# Altium PCB Sound_Sensor.PcbDoc (part 2 of 3)
Units mil, origin at the board's own origin, x right, y up, seen from the top; angles counter-clockwise.
Board outline 3543.31 x 3543.31 mil, 2 copper layers (Top Layer, Bottom Layer), stack 57 mil thick; 199 components, 167 nets, 606 pads, 246 vias.
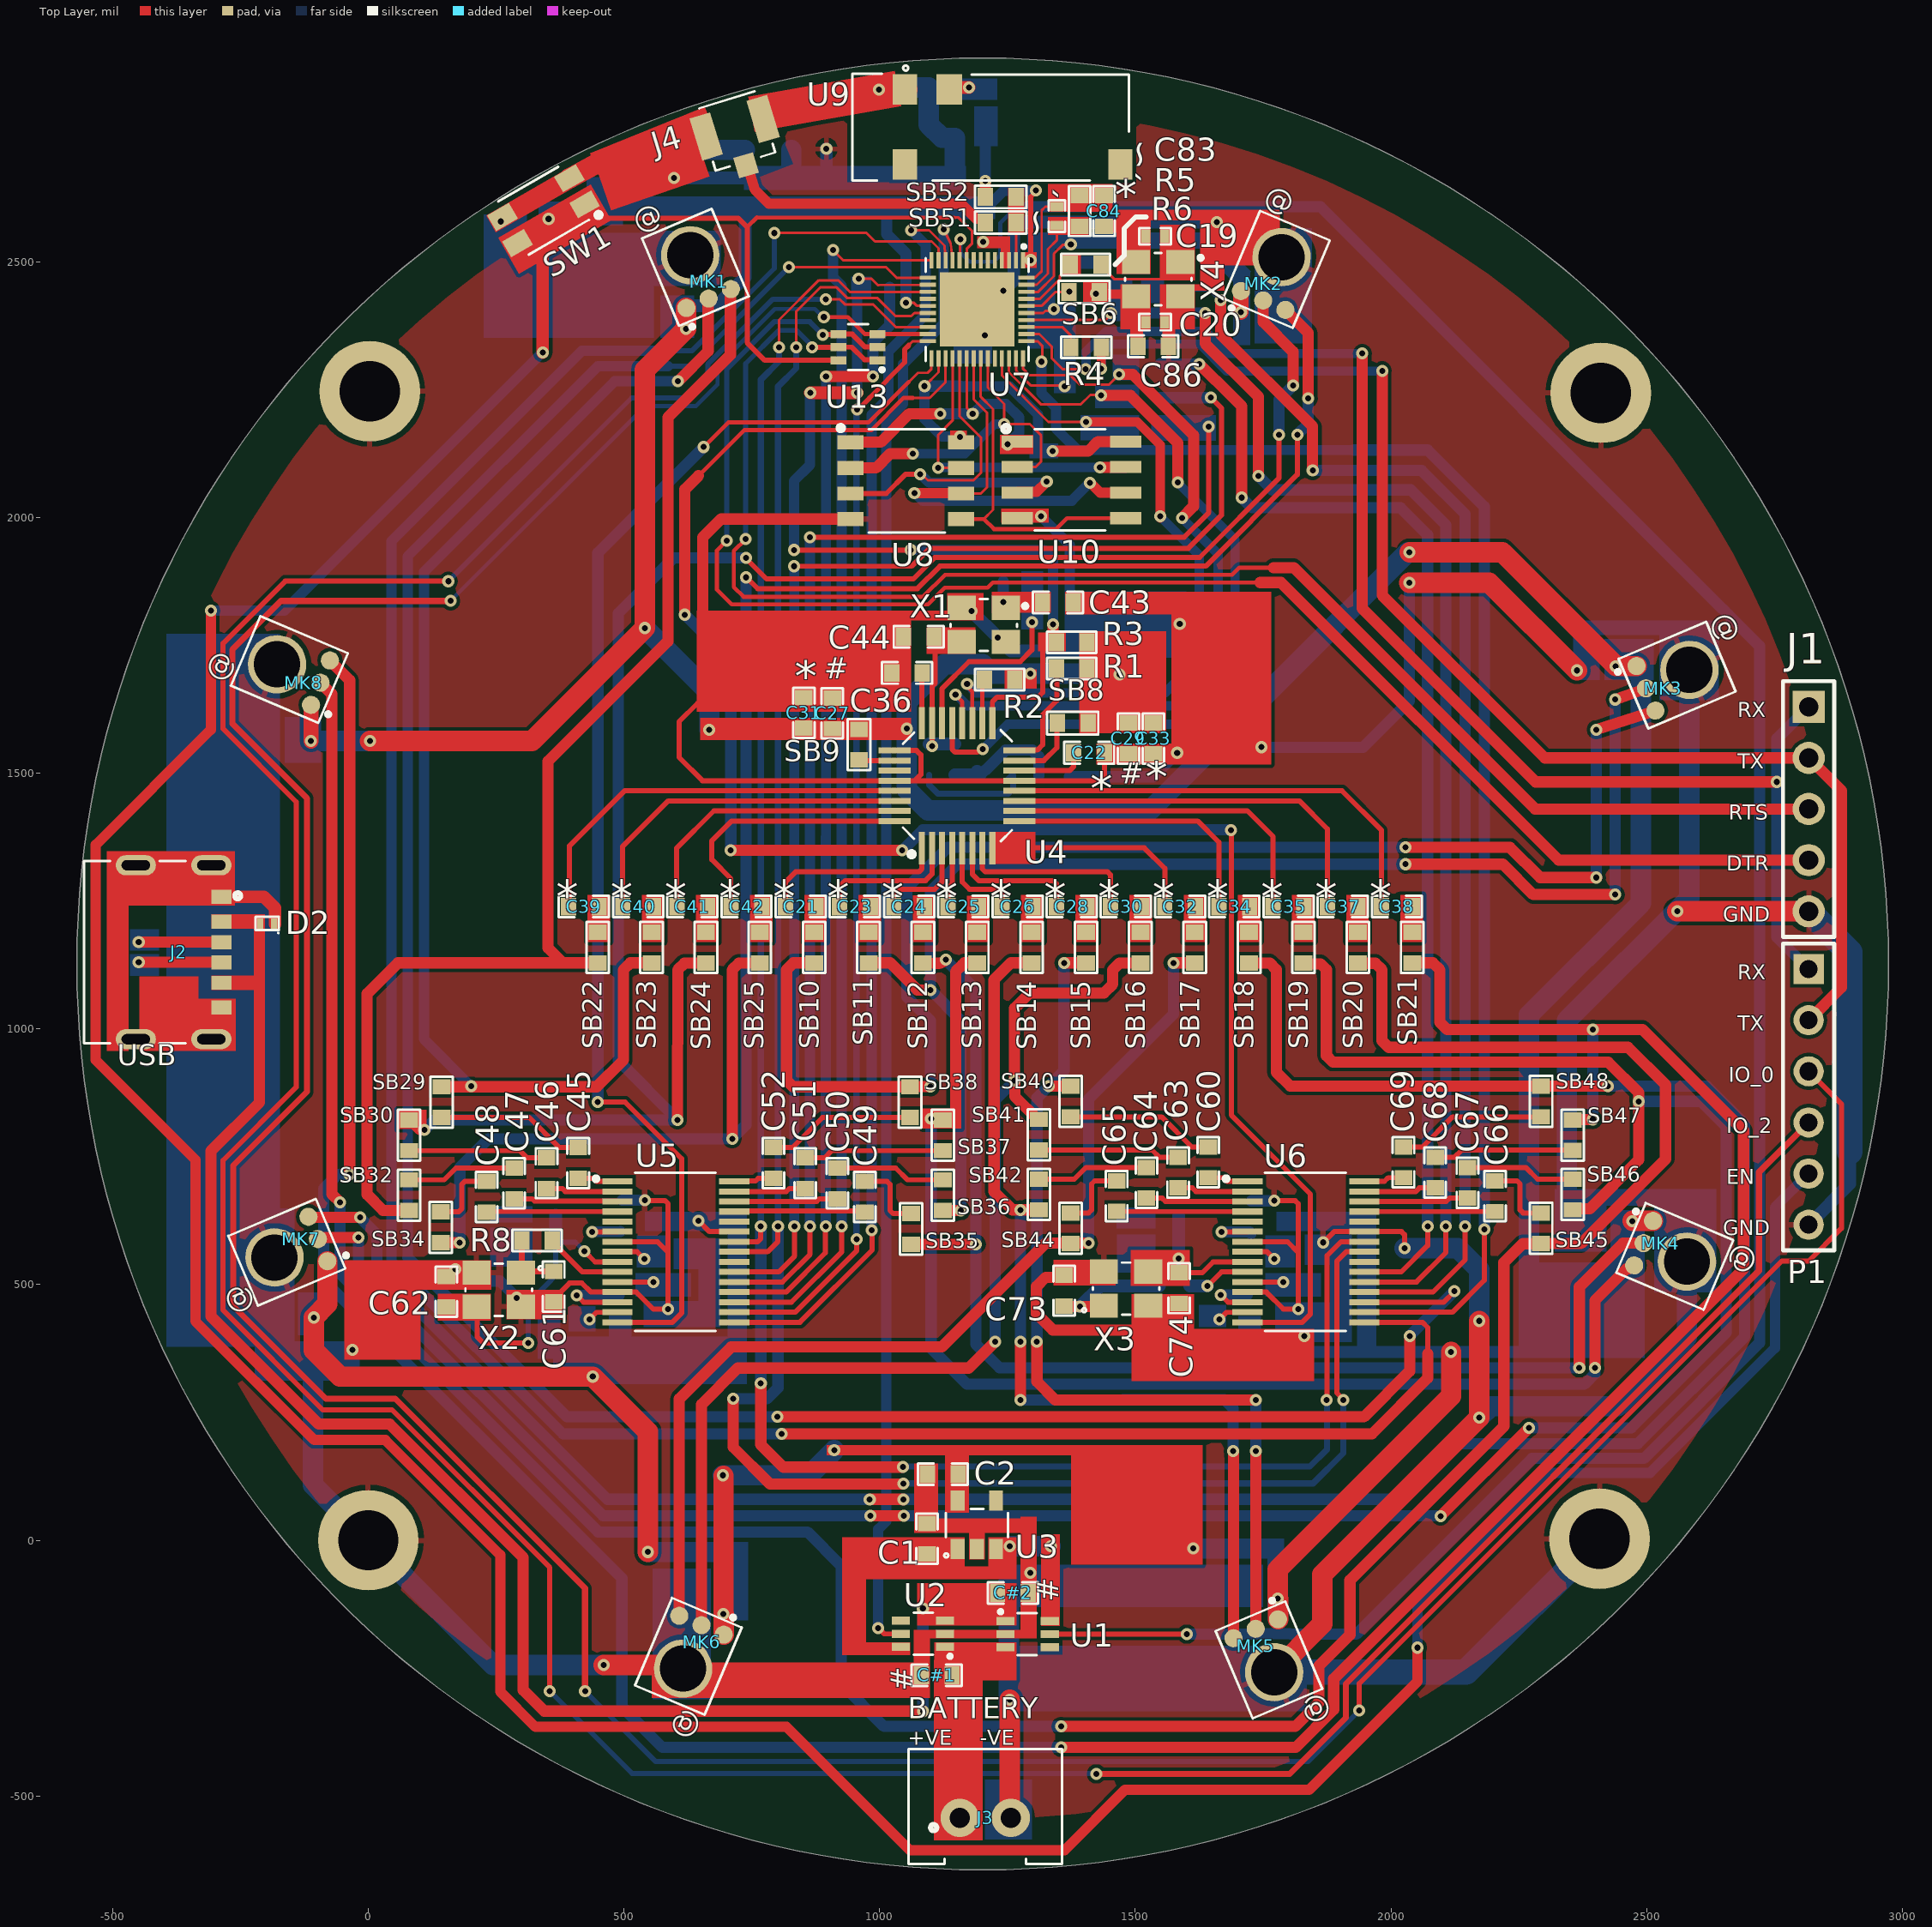
[diagram p0: Top Layer view]

## Part data (continued)
D2 D3: "DIODE TVS SMD 5.5V 5A 90W", Breakdown Voltage=6V, Capacitance=12pF, Case/Package=SON, Clamping Voltage=14V, Leakage Current=100nA, Manufacturer="Texas Instruments", Max Operating Temperature=125°C, Min Operating Temperature=-40°C, Package Quantity=1, Peak Pulse Current=5A, Peak Pulse Power=90W, Power Line Protection=No, Resistor Type=Zener, Reverse Standoff Voltage=5.5V, Supplier Part Number 1=595-TPD1E10B06DPYR, Test Current=1mA, Category="TVS Diodes", ComponentLink1Description=https://datasheet.ciiva.com/22691/1877100-22691786.pdf?src-supplier=Element14, ComponentLink1URL=https://datasheet.ciiva.com/22691/1877100-22691786.pdf?src-supplier=Element14, ComponentLink2Description=https://datasheet.ciiva.com/46384/1877100-46384054.pdf?src-supplier=Element14, ComponentLink2URL=https://datasheet.ciiva.com/46384/1877100-46384054.pdf?src-supplier=Element14, ComponentLink3Description=https://datasheet.ciiva.com/2961/tpd1e10b06-2961245.pdf?src-supplier=Digi-Key, ComponentLink3URL=https://datasheet.ciiva.com/2961/tpd1e10b06-2961245.pdf?src-supplier=Digi-Key, ComponentLink4Description=https://datasheet.ciiva.com/6574/tpd1e10b06-6574654.pdf?src-supplier=Digi-Key, ComponentLink4URL=https://datasheet.ciiva.com/6574/tpd1e10b06-6574654.pdf?src-supplier=Digi-Key, ComponentLink5Description=https://datasheet.ciiva.com/2961/tpd1e10b06-2961246.pdf?src-supplier=Digi-Key, ComponentLink5URL=https://datasheet.ciiva.com/2961/tpd1e10b06-2961246.pdf?src-supplier=Digi-Key, ComponentLink6Description=https://datasheet.ciiva.com/14195/tpd1e10b06-14195178.pdf?src-supplier=Avnet, ComponentLink6URL=https://datasheet.ciiva.com/14195/tpd1e10b06-14195178.pdf?src-supplier=Avnet, Contact Plating=Gold, Diode Type=ZENER, Direction=Bidirectional, Element Configuration=Single, ESD Protection=Yes, Height=0.35mm, Interface=GPIO, Lead Free="Lead Free", Length=1.1mm, Manufacturer Part Number=TPD1E10B06DPYR, Max Reverse Leakage Current=100nA, Min Breakdown Voltage=6V, Number of Bidirectional Channels=1, Number of Channels=1, Number of Pins=2, Packaging="Tape and Reel", Pricing 1="1=0.39000, 10=0.29800, 50=0.29800, 100=0.18600, 500=0.12700, 1000=0.09800, 2500=0.08300, 10000=0.07500 (USD)", Radiation Hardening=No, REACH SVHC="No SVHC", RoHS=Yes, RoHS Compliant=Yes, Series=-, Supplier 1=Mouser, Width=0.7mm, Working Voltage=5.5V
J1: "05P MTA100 HDR ASSY (NARROW)", Color=Natural, Contact Current Rating=5A, Contact Resistance=6mR, Flammability Rating="UL94 V-0", Manufacturer="TE Connectivity", Max Operating Temperature=221°C, Max Voltage Rating (AC)=250V, Min Operating Temperature=-67°C, Package Quantity=500, Supplier Part Number 1=A31115-ND, Approvals=CSA, Backwall/Post Interruptions="No (Without)", Category=Connectors, ComponentLink1Description=https://datasheet.ciiva.com/16307/3-644456-5-16307486.pdf?src-supplier=Future+Electronics, ComponentLink1URL=https://datasheet.ciiva.com/16307/3-644456-5-16307486.pdf?src-supplier=Future+Electronics, ComponentLink2Description=https://datasheet.ciiva.com/3118/eng-ds-82056-mta-0608-3118213.pdf?src-supplier=Avnet, ComponentLink2URL=https://datasheet.ciiva.com/3118/eng-ds-82056-mta-0608-3118213.pdf?src-supplier=Avnet, ComponentLink3Description=https://datasheet.ciiva.com/30250/8852eng-ds-82056-mta-0608-30250984.pdf?src-supplier=Onlinecomponents.com, ComponentLink3URL=https://datasheet.ciiva.com/30250/8852eng-ds-82056-mta-0608-30250984.pdf?src-supplier=Onlinecomponents.com, ComponentLink4Description=https://datasheet.ciiva.com/14641/70087179-14641766.pdf?src-supplier=Allied+Electronics, ComponentLink4URL=https://datasheet.ciiva.com/14641/70087179-14641766.pdf?src-supplier=Allied+Electronics, ComponentLink5Description=https://datasheet.ciiva.com/709/eng-cd-644456-d2-709724.pdf?src-supplier=Digi-Key, ComponentLink5URL=https://datasheet.ciiva.com/709/eng-cd-644456-d2-709724.pdf?src-supplier=Digi-Key, Connector System=Wire-to-Board, Connector Type=Plug,Header,Pin, Contact Finish - Mating=TIN, Contact Gender=Male, Contact Material="Copper Alloy", Contact Mating Length=7.49mm, Contact Plating=Tin,Matte, Contact Retention="No (Without)", Contact Shape=Square, Contact Style=Straight, Contact Type="Male Pin", Current Rating=5A, Depth=2.33mm, ELV=Compliant, Gender=Male, Height=10.03mm, Housing Color=Natural, Housing Material=Polyester, Insulation Color=Natural, Insulation Material=Thermoplastic, Lead Free="Lead Free", Length=12.4mm, Manufacturer Part Number=3-644456-5, Mating Alignment="No (Without)", Mating Retention="No (Without)", Mount="Through Hole", Number of Contacts=5, Number of Positions=5, Number of Rows=1, Orientation=Straight, Packaging=Bag, PCB Mount Alignment="No (Without)", PCB Mount Retention=Without, PCB Mounting Orientation=Vertical, PCB Thickness=0.063inch, Pitch=2.54mm, Plating Thickness=1.27um, Pricing 1="1=0.45000, 10=0.39200, 100=0.32330, 500=0.28114, 1000=0.23195, 5000=0.20383, 10000=0.18978 (USD)", Radiation Hardening=No, REACH SVHC=Unknown, RoHS=Yes, Sealable="No (Without)", Series=MTA-100, Shrouded="No (Without)", Stock 1=30835, Strain Relief="No (Without)", Supplier 1=Digi-Key, Tail Length=0.11inch, Termination=Solder, Underplate Material=Nickel, Voltage Rating=250V, Voltage Rating (AC)=250V
J2: "USB 3.1 1 Surface Mount 6 Female -25℃~+85℃ Type-C SMD USB Connectors ROHS", Manufacturer=XKB, ComponentLink1Description=LCSC, ComponentLink1URL=https://www.lcsc.com/product-detail/span-style-background-color-ff0-USB-span-Connectors_XKB-Connectivity-U262-061N-4BVC11_C2764612.html, Manufacturer Part Number=U262-061N-4BVC11
J3: library part "2 Pin JST Connector", "2 PIN JST Connector"
J4: "CONN U.FL RCPT STR 50 OHM SMD", Case/Package=SMD/SMT, Manufacturer=Hirose, Package Quantity=10000, Supplier Part Number 1=U.FL-R-SMT-1(80)-CUTT, ComponentLink1Description=https://www.hirose.com/product/en/download_file/key_name/U.FL-R-SMT-1%2880%29/category/Specification%20Sheet/doc_file_id/37638/?file_category_id=9&item_id=03310472280&is_series=&src-supplier=Digi-Key, ComponentLink1URL=https://www.hirose.com/product/en/download_file/key_name/U.FL-R-SMT-1%2880%29/category/Specification%20Sheet/doc_file_id/37638/?file_category_id=9&item_id=03310472280&is_series=&src-supplier=Digi-Key, ComponentLink2Description=http://www.mouser.com/ds/2/185/U.FL_catalog-939761.pdf?src-supplier=Mouser, ComponentLink2URL=http://www.mouser.com/ds/2/185/U.FL_catalog-939761.pdf?src-supplier=Mouser, Lead Free="Lead Free", Manufacturer Part Number=U.FL-R-SMT-1(80), Packaging="Tape and Reel", Pricing 1="1=1.07, 500=0.785, 1500=0.74, 2500=0.72, 5000=0.695 (USD)", Stock 1=1272, Supplier 1="Future Electronics"
L1: library part SDCL1608C2N0STDF, "2nH ±0.3nH 0603 Inductors", Manufacturer=Sunlord, Package Case=0603, Rated Current=300mA, Inductance=2nH
L2 L3: library part LQG18HN3N3S00D, "FIXED IND 3.3NH 1A 120 MOHM SMD", Case Code (Imperial)=0603, Case Code (Metric)=1608, Current Rating=500mA, DC Resistance (DCR)=150mR, Manufacturer=Murata, Max Operating Temperature=85°C, Min Operating Temperature=-55°C, Package Quantity=4000, Self Resonant Frequency=6GHz, Supplier Part Number 1=7254954, Test Frequency=100MHz, Case/Package=0603, Category="Fixed Inductors", ComponentLink1Description=https://datasheet.ciiva.com/11801/0900766b80f1087c-11801482.pdf?src-supplier=RSComponents, ComponentLink1URL=https://datasheet.ciiva.com/11801/0900766b80f1087c-11801482.pdf?src-supplier=RSComponents, ComponentLink2Description=https://datasheet.ciiva.com/8510/l0075s0083lqg18h-8510694.pdf?src-supplier=Avnet, ComponentLink2URL=https://datasheet.ciiva.com/8510/l0075s0083lqg18h-8510694.pdf?src-supplier=Avnet, ComponentLink3Description=https://datasheet.ciiva.com/8002/5102-8002599.pdf?src-supplier=Element14, ComponentLink3URL=https://datasheet.ciiva.com/8002/5102-8002599.pdf?src-supplier=Element14, ComponentLink4Description=https://datasheet.ciiva.com/6690/l0075s0083lqg18h-6690799.pdf?src-supplier=Digi-Key, ComponentLink4URL=https://datasheet.ciiva.com/6690/l0075s0083lqg18h-6690799.pdf?src-supplier=Digi-Key, ComponentLink5Description=https://datasheet.ciiva.com/4978/o05e-4978491.pdf?src-supplier=Mouser, ComponentLink5URL=https://datasheet.ciiva.com/4978/o05e-4978491.pdf?src-supplier=Mouser, ComponentLink6Description=https://datasheet.ciiva.com/18089/getdatasheetpartid-180322-18089964.pdf?src-supplier=Verical, ComponentLink6URL=https://datasheet.ciiva.com/18089/getdatasheetpartid-180322-18089964.pdf?src-supplier=Verical, ComponentLink7Description=https://datasheet.ciiva.com/6690/l0075s0083lqg18h-6690797.pdf?src-supplier=Digi-Key, ComponentLink7URL=https://datasheet.ciiva.com/6690/l0075s0083lqg18h-6690797.pdf?src-supplier=Digi-Key, ComponentLink8Description=https://datasheet.ciiva.com/6690/l0075s0083lqg18h-6690798.pdf?src-supplier=Digi-Key, ComponentLink8URL=https://datasheet.ciiva.com/6690/l0075s0083lqg18h-6690798.pdf?src-supplier=Digi-Key, Core Material=Air, DC Current=500mA, Depth=0.95mm, Height=0.8mm, Height - Seated (Max)=0.037inch, Inductance=3.3nH, Lead Free="Lead Free", Length=1.6mm, Manufacturer Part Number=LQG18HN3N3S00D, Max DC Current=500mA, Military Standard=Not, Mount="Surface Mount", Packaging="Tape and Reel", Pricing 1="10=0.18800, 500=0.08200, 1000=0.07100, 2000=0.05900, 5000=0.05600 (USD)", Q Factor=12, Radiation Hardening=No, Rated Current-Max=500mA, REACH SVHC="No SVHC", RoHS=Yes, RoHS Compliant=Yes, Series=LQG18H, Shielding=Unshielded, Stock 1=1, Supplier 1=RSComponents, Termination=SMD/SMT, Width=0.8mm
L4 L5: library part LQG15HS1N2S02D, "FIXED IND 1.2NH 1A 90 MOHM SMD", Case Code (Imperial)=0402, Case Code (Metric)=1005, Current Rating=300mA, DC Resistance (DCR)=90mR, Manufacturer=Murata, Max Operating Temperature=125°C, Min Operating Temperature=-55°C, Package Quantity=10000, Self Resonant Frequency=6GHz, Supplier Part Number 1=8119795, Test Frequency=100MHz, Case/Package=0402, Category="Fixed Inductors", ComponentLink1Description=https://datasheet.ciiva.com/11801/0900766b8090d53b-11801370.pdf?src-supplier=RSComponents, ComponentLink1URL=https://datasheet.ciiva.com/11801/0900766b8090d53b-11801370.pdf?src-supplier=RSComponents, ComponentLink2Description=https://datasheet.ciiva.com/16207/product-16207869.pdf?src-supplier=Future+Electronics, ComponentLink2URL=https://datasheet.ciiva.com/16207/product-16207869.pdf?src-supplier=Future+Electronics, ComponentLink3Description=https://datasheet.ciiva.com/1038/l0075s0083lqg15hs-1038116.pdf?src-supplier=Digi-Key, ComponentLink3URL=https://datasheet.ciiva.com/1038/l0075s0083lqg15hs-1038116.pdf?src-supplier=Digi-Key, ComponentLink4Description=https://datasheet.ciiva.com/1038/l0075s0083lqg15hs-1038115.pdf?src-supplier=Digi-Key, ComponentLink4URL=https://datasheet.ciiva.com/1038/l0075s0083lqg15hs-1038115.pdf?src-supplier=Digi-Key, ComponentLink5Description=https://datasheet.ciiva.com/1038/l0075s0083lqg15hs-1038117.pdf?src-supplier=Digi-Key, ComponentLink5URL=https://datasheet.ciiva.com/1038/l0075s0083lqg15hs-1038117.pdf?src-supplier=Digi-Key, ComponentLink6Description=https://datasheet.ciiva.com/4977/o05e-4977850.pdf?src-supplier=Mouser, ComponentLink6URL=https://datasheet.ciiva.com/4977/o05e-4977850.pdf?src-supplier=Mouser, ComponentLink7Description=https://datasheet.ciiva.com/8510/l0075s0083lqg15hs-8510828.pdf?src-supplier=Avnet, ComponentLink7URL=https://datasheet.ciiva.com/8510/l0075s0083lqg15hs-8510828.pdf?src-supplier=Avnet, Core Material=Air, DC Current=300mA, Depth=0.55mm, Height=0.5mm, Height - Seated (Max)=0.022inch, Inductance=1.2nH, Lead Free="Lead Free", Length=1mm, Manufacturer Part Number=LQG15HS1N2S02D, Max DC Current=300mA, Military Standard=Not, Mount="Surface Mount", Packaging="Tape and Reel", Pricing 1="100=0.04000, 5000=0.02800, 10000=0.02200, 20000=0.02000, 50000=0.01700 (USD)", Q Factor=8, Radiation Hardening=No, Rated Current-Max=300mA, RoHS=Yes, RoHS Compliant=Yes, Series=LQG15HS, Shielding=Unshielded, Stock 1=1, Supplier 1=RSComponents, Termination=SMD/SMT, Width=0.02inch
L6: library part FHW0603UC1N6KST, "IND 700mA 1.6nH ±10% 40mΩ 0603"
MK1 MK2 MK3 MK4 MK5 MK6 MK7 MK8: "MICROPHONE MEMS ANALOG NC -32DB", Manufacturer="TDK InvenSense", Operating Supply Current=285uA, Supplier Part Number 1=69AC5942, ComponentLink1Description=https://www.invensense.com/wp-content/uploads/2017/01/ICS-40730-Datasheet.pdf?src-supplier=Digi-Key, ComponentLink1URL=https://www.invensense.com/wp-content/uploads/2017/01/ICS-40730-Datasheet.pdf?src-supplier=Digi-Key, ComponentLink2Description=http://www.invensense.com/wp-content/uploads/2018/12/DS-000139-ICS-40730-v1.0.pdf?src-supplier=Digi-Key, ComponentLink2URL=http://www.invensense.com/wp-content/uploads/2018/12/DS-000139-ICS-40730-v1.0.pdf?src-supplier=Digi-Key, Impedance=750R, Manufacturer Part Number=ICS-40730, Output Type=Analog, Packaging="Cut Tape", Pricing 1="1=3.61000, 10=2.99000, 25=2.76000, 50=2.59000, 100=2.43000 (USD)", RoHS=No, RoHS Compliant=No, Shape=Rectangular, Stock 1=51, Supplier 1=Newark, Termination=Solder
P1: library part e-50004, "CONN HEADER VERT 6POS 2.54MM", Color=Black, Current Rating=3A, Manufacturer="Wurth Electronics", Max Operating Temperature=125°C, Min Operating Temperature=-40°C, Supplier Part Number 1=732-5319-ND, Voltage Rating=250V, ComponentLink1Description=http://www.farnell.com/cad/1737268.pdf?src-supplier=Element14, ComponentLink1URL=http://www.farnell.com/cad/1737268.pdf?src-supplier=Element14, ComponentLink2Description=https://katalog.we-online.de/em/datasheet/6130xx11121.pdf?src-supplier=Digi-Key, ComponentLink2URL=https://katalog.we-online.de/em/datasheet/6130xx11121.pdf?src-supplier=Digi-Key, ComponentLink3Description=http://www.mouser.com/ds/2/445/6130xx11121-538006.pdf?src-supplier=Mouser, ComponentLink3URL=http://www.mouser.com/ds/2/445/6130xx11121-538006.pdf?src-supplier=Mouser, Connector Type="Male Pin", Contact Gender=Male, Contact Material="Copper Alloy,Copper", Contact Mating Length=0.236inch, Contact Plating=Gold, Gender=Male, Housing Material=PBT, Lead Free="Lead Free", Manufacturer Part Number=61300611121, Mount="Through Hole", Number of Contacts=6, Number of Positions=6, Number of Rows=1, Packaging=Bulk, Pitch=0.1inch, Pricing 1="1=0.33, 10=0.279, 25=0.232, 50=0.194, 100=0.176, 1000=0.16 (USD)", REACH SVHC=Unknown, Stock 1=14573, Supplier 1=Digi-Key, Termination="Through Hole"
R1 R2 R3: library part CRGH0603J100K, "RES SMD 100K OHM 5% 1/5W 0603", Case Code (Imperial)=0603, Case Code (Metric)=1608, Manufacturer="TE Connectivity", Max Operating Temperature=125°C, Min Operating Temperature=-55°C, Number of Resistors=1, Power Rating=200mW, Resistance=100kR, Resistance Tolerance=5%, Resistor Type="Thick Film,Power resistor", Supplier Part Number 1=A126393DKR-ND, Temperature Coefficient=100ppm/°C, Voltage Rating=50V, Case/Package=0603, ComponentLink1Description=http://www.farnell.com/datasheets/2007183.pdf?src-supplier=Element14, ComponentLink1URL=http://www.farnell.com/datasheets/2007183.pdf?src-supplier=Element14, Depth=0.8mm, ELV=Compliant, Height=0.45mm, Length=1.6mm, Manufacturer Part Number=CRGH0603J100K, Mount="Surface Mount", Number of Terminations=2, Packaging="Tape and Reel", Pricing 1="1=0.1, 10=0.049, 100=0.02, 1000=0.00899, 2500=0.0078 (USD)", REACH SVHC="No SVHC", RoHS Compliant=Yes, Series=CRGH, Stock 1=23277, Supplier 1=Digi-Key, Technology="THICK FILM", Termination=Solder, Tolerance=5%, Voltage Rating (DC)=50V, Width=0.8mm
R4: library part RC0603FR-07499RL, "RES SMD 499Ω ± 1.00% 0.1W ± 100ppm/℃ 0603", Case Code (Imperial)=0603, Case Code (Metric)=1608, Manufacturer=Yageo, Max Operating Temperature=155°C, Max Power Dissipation=100mW, Min Operating Temperature=-55°C, Package Quantity=1, Resistor Type="Thick Film", Supplier Part Number 1=1995585, Temperature Coefficient=100ppm/°C, Tolerance=1%, Voltage Rating=50V, Case/Package=0603, Category="Chip SMD Resistors", ComponentLink1Description=https://datasheet.ciiva.com/11808/0900766b80f96399-11808558.pdf?src-supplier=RSComponents, ComponentLink1URL=https://datasheet.ciiva.com/11808/0900766b80f96399-11808558.pdf?src-supplier=RSComponents, ComponentLink2Description=https://datasheet.ciiva.com/2453/pyu-r-int-thick-7-2453956.pdf?src-supplier=Digi-Key, ComponentLink2URL=https://datasheet.ciiva.com/2453/pyu-r-int-thick-7-2453956.pdf?src-supplier=Digi-Key, ComponentLink3Description=https://datasheet.ciiva.com/2453/pyu-r-int-thick-7-2453957.pdf?src-supplier=Digi-Key, ComponentLink3URL=https://datasheet.ciiva.com/2453/pyu-r-int-thick-7-2453957.pdf?src-supplier=Digi-Key, ComponentLink4Description=https://datasheet.ciiva.com/2453/pyu-r-int-thick-7-2453955.pdf?src-supplier=Digi-Key, ComponentLink4URL=https://datasheet.ciiva.com/2453/pyu-r-int-thick-7-2453955.pdf?src-supplier=Digi-Key, ComponentLink5Description=https://datasheet.ciiva.com/12558/rc0603-272842-12558391.pdf?src-supplier=Mouser, ComponentLink5URL=https://datasheet.ciiva.com/12558/rc0603-272842-12558391.pdf?src-supplier=Mouser, ComponentLink6Description=https://datasheet.ciiva.com/8885/pyu-rc0603-51-rohs-l-4-8885483.pdf?src-supplier=Avnet, ComponentLink6URL=https://datasheet.ciiva.com/8885/pyu-rc0603-51-rohs-l-4-8885483.pdf?src-supplier=Avnet, Construction=Rectangular, Contact Plating=Tin,Matte, Depth=0.8mm, Features="Moisture Resistant", Height=0.45mm, Lead Free="Lead Free", Length=1.6mm, Manufacturer Part Number=RC0603FR-07499RL, Military Standard=Not, Mount="Surface Mount", Number of Terminations=2, Packaging="Tape and Reel", Power Rating=100mW, Pricing 1="5000=0.00300, 10000=0.00300, 15000=0.00300, 20000=0.00200 (GBP)", Radiation Hardening=No, Resistance=499R, RoHS=Yes, RoHS Compliant=Yes, Series=RC, Size Code=0603, Stock 1=900, Supplier 1=RSComponents, Technology="THICK FILM", Termination=SMD/SMT, Voltage Rating (DC)=50V, Width=0.031inch
R5: library part RC0603FR-0720KL, "RES SMD 20K OHM 1% 1/10W 0603"
R6 R7 R8 R9: library part RC0603FR-070RL, "RES SMD 0R, 1%, 0.1W, 0603", Case Code (Imperial)=0603, Case Code (Metric)=1608, Current Rating=1A, Manufacturer=Yageo, Max Operating Temperature=155°C, Max Power Dissipation=100mW, Min Operating Temperature=-55°C, Package Quantity=5000, Resistance=0mR, Resistor Type="Thick Film", Temperature Coefficient=200ppm/°C, Tolerance=1%, Voltage Rating=50V, Working Voltage=75V, Case/Package=0603, Category="Chip SMD Resistors", ComponentLink1Description=https://datasheet.ciiva.com/11808/0900766b80f96399-11808172.pdf?src-supplier=RSComponents, ComponentLink1URL=https://datasheet.ciiva.com/11808/0900766b80f96399-11808172.pdf?src-supplier=RSComponents, ComponentLink2Description=https://datasheet.ciiva.com/5558/rc0603-272842-5558341.pdf?src-supplier=Mouser, ComponentLink2URL=https://datasheet.ciiva.com/5558/rc0603-272842-5558341.pdf?src-supplier=Mouser, ComponentLink3Description=https://datasheet.ciiva.com/46382/443971-46382072.pdf?src-supplier=Element14, ComponentLink3URL=https://datasheet.ciiva.com/46382/443971-46382072.pdf?src-supplier=Element14, ComponentLink4Description=https://datasheet.ciiva.com/29721/pyu-r-int-thick-7-29721178.pdf?src-supplier=Digi-Key, ComponentLink4URL=https://datasheet.ciiva.com/29721/pyu-r-int-thick-7-29721178.pdf?src-supplier=Digi-Key, ComponentLink5Description=https://datasheet.ciiva.com/5684/443971-5684699.pdf?src-supplier=Farnell, ComponentLink5URL=https://datasheet.ciiva.com/5684/443971-5684699.pdf?src-supplier=Farnell, ComponentLink6Description=https://datasheet.ciiva.com/7983/443971-7983627.pdf?src-supplier=Element14, ComponentLink6URL=https://datasheet.ciiva.com/7983/443971-7983627.pdf?src-supplier=Element14, ComponentLink7Description=https://datasheet.ciiva.com/29721/pyu-rc0603-51-rohs-l-4-29721179.pdf?src-supplier=Digi-Key, ComponentLink7URL=https://datasheet.ciiva.com/29721/pyu-rc0603-51-rohs-l-4-29721179.pdf?src-supplier=Digi-Key, ComponentLink8Description=https://datasheet.ciiva.com/22643/1868787-22643388.pdf?src-supplier=Element14, ComponentLink8URL=https://datasheet.ciiva.com/22643/1868787-22643388.pdf?src-supplier=Element14, Contact Plating=Tin,Matte, Depth=0.8mm, Features="Moisture Resistant", Height=0.45mm, Lead Free="Lead Free", Length=1.6mm, Manufacturer Part Number=RC0603FR-070RL, Military Standard=Not, Number of Pins=2, Number of Terminations=2, Packaging="Tape and Reel", Power Rating=100mW, Pricing 1="5000=0.00320, 5000=0.00490, 50000=0.00450, 500000=0.00250, 2500000=0.00150 (USD)", Radiation Hardening=No, REACH SVHC="No SVHC", RoHS=Yes, Stock 1=1270000, Supplier 1="Arrow Electronics", Supplier Part Number 1=RC0603FR-070RL, Termination=SMD/SMT, Voltage Rating (DC)=50V, Width=0.031inch
R10 R17: library part RC0603FR-0710KL, "RES SMD 10K OHM 1% 1/10W 0603", Case Code (Imperial)=0603, Case Code (Metric)=1608, Manufacturer=Yageo, Max Operating Temperature=155°C, Min Operating Temperature=-55°C, Power Rating=100mW, Resistance=10kR, Supplier Part Number 1=311-10.0KHRDKR-ND, Temperature Coefficient=100ppm/°C, Tolerance=1%, Voltage Rating=75V, Voltage Rating (DC)=50V, Case/Package=0603, ComponentLink1Description=http://www.farnell.com/datasheets/38590.pdf?src-supplier=Element14, ComponentLink1URL=http://www.farnell.com/datasheets/38590.pdf?src-supplier=Element14, ComponentLink2Description=https://www.verical.com/server-webapp/html/getDatasheet?partID=409289&src-supplier=Verical, ComponentLink2URL=https://www.verical.com/server-webapp/html/getDatasheet?partID=409289&src-supplier=Verical, ComponentLink3Description=http://www.farnell.com/datasheets/1868787.pdf?src-supplier=Element14, ComponentLink3URL=http://www.farnell.com/datasheets/1868787.pdf?src-supplier=Element14, ComponentLink4Description=http://www.farnell.com/datasheets/2167052.pdf?src-supplier=Element14, ComponentLink4URL=http://www.farnell.com/datasheets/2167052.pdf?src-supplier=Element14, ComponentLink5Description=http://www.farnell.com/datasheets/443971.pdf?src-supplier=Element14, ComponentLink5URL=http://www.farnell.com/datasheets/443971.pdf?src-supplier=Element14, Composition="Thick Film", Depth=0.8mm, Height=0.45mm, Lead Free="Lead Free", Lead Pitch=0.3mm, Length=1.6mm, Manufacturer Part Number=RC0603FR-0710KL, Military Standard=Not, Number of Pins=2, Packaging="Tape and Reel", Pricing 1="1=0.1, 10=0.024, 100=0.0097, 1000=0.00437, 2500=0.00379 (USD)", REACH SVHC="No SVHC", Stock 1=144725424, Supplier 1=Digi-Key, Termination=SMD/SMT, Weight=7.1E-05oz, Width=0.8mm
R11 R12: library part RC0603JR-075K1L, "RES SMD 5.1K OHM 5% 1/10W 0603", Case Code (Imperial)=0603, Case Code (Metric)=1608, Manufacturer=Yageo, Max Operating Temperature=155°C, Max Power Dissipation=100mW, Min Operating Temperature=-55°C, Resistance=5.1kR, Resistance Tolerance=5%, Resistor Type="Thick Film", Supplier Part Number 1=311-5.1KGRCT-ND, Temperature Coefficient=100ppm/°C, Voltage Rating=50V, Case/Package=0603, Category="Chip SMD Resistors", ComponentLink1Description=http://www.mouser.com/ds/2/447/RC0603-272842.pdf?src-supplier=Mouser, ComponentLink1URL=http://www.mouser.com/ds/2/447/RC0603-272842.pdf?src-supplier=Mouser, ComponentLink2Description=http://components.arrow.com/part/dataview/0323_00047491?src-supplier=Arrow+Europe, ComponentLink2URL=http://components.arrow.com/part/dataview/0323_00047491?src-supplier=Arrow+Europe, ComponentLink3Description=http://www.farnell.com/datasheets/2167052.pdf?src-supplier=Farnell, ComponentLink3URL=http://www.farnell.com/datasheets/2167052.pdf?src-supplier=Farnell, ComponentLink4Description=http://www.farnell.com/datasheets/2167052.pdf?src-supplier=Element14, ComponentLink4URL=http://www.farnell.com/datasheets/2167052.pdf?src-supplier=Element14, ComponentLink5Description=http://www.farnell.com/datasheets/2167052.pdf?src-supplier=Newark, ComponentLink5URL=http://www.farnell.com/datasheets/2167052.pdf?src-supplier=Newark, ComponentLink6Description=http://www.farnell.com/datasheets/1868787.pdf?src-supplier=Newark, ComponentLink6URL=http://www.farnell.com/datasheets/1868787.pdf?src-supplier=Newark, ComponentLink7Description=http://www.yageo.com/documents/recent/PYu-RC_Group_51_RoHS_L_10.pdf?src-supplier=Digi-Key, ComponentLink7URL=http://www.yageo.com/documents/recent/PYu-RC_Group_51_RoHS_L_10.pdf?src-supplier=Digi-Key, ComponentLink8Description=http://www.yageo.com/documents/recent/PYu-RC0603_51_RoHS_L_7.pdf?src-supplier=Future+Electronics, ComponentLink8URL=http://www.yageo.com/documents/recent/PYu-RC0603_51_RoHS_L_7.pdf?src-supplier=Future+Electronics, Construction=Rectangular, Depth=0.8mm, Features="Moisture Resistant", Lead Free="Lead Free", Length=1.6mm, Manufacturer Part Number=RC0603JR-075K1L, Military Standard=Not, Number of Pins=2, Number of Terminations=2, Packaging="Tape and Reel", Power Rating=100mW, Pricing 1="1=0.10000, 10=0.02000, 100=0.00800, 1000=0.00360, 2500=0.00312 (USD)", REACH SVHC="No SVHC", RoHS=Yes, RoHS Compliant=Yes, Series=RC, Size Code=0603, Stock 1=245818, Supplier 1=Digi-Key, Termination=SMD/SMT, Tolerance=5%, Voltage Rating (DC)=50V
SB1 SB2 SB3 SB4 SB5 SB6 SB7 SB8 SB9 SB10 SB11 SB12 SB13 SB14 SB15 SB16 SB17 SB18 SB19 SB20 SB21 SB22 SB23 SB24 SB25 SB26 SB27 SB28 SB29 SB30 SB31 SB32 SB33 SB34 SB35 SB36 SB37 SB38 SB39 SB40 SB41 SB42 SB43 SB44 SB45 SB46 SB47 SB48 SB49 SB50 SB51 SB52 SB70 SB71 SB72: "Solder Bridge ON"
SW1: "3mm 2mm Round Button 50mA Top3.65mm SPST 12V SMD Tactile Switches", Manufacturer=XKB, Package=Custom, ComponentLink1Description=LCSC, ComponentLink1URL=https://lcsc.com/product-detail/Tactile-Switches_XKB-Connectivity-TS-1185EC-C-D-B_C318893.html, Manufacturer Part No=TS-1185EC-C-D-B
U1 U2: "IC OR CTRLR IDEAL DIODE SC70-6", Manufacturer="Texas Instruments", Supplier Part Number 1=595-LM66100DCKR, Category="Integrated Circuits (ICs)", ComponentLink1Description=http://www.ti.com/general/docs/suppproductinfo.tsp?distId=10&amp;gotoUrl=http%3A%2F%2Fwww.ti.com%2Flit%2Fgpn%2flm66100&src-supplier=Digi-Key, ComponentLink1URL=http://www.ti.com/general/docs/suppproductinfo.tsp?distId=10&amp;gotoUrl=http%3A%2F%2Fwww.ti.com%2Flit%2Fgpn%2flm66100&src-supplier=Digi-Key, Manufacturer Part Number=LM66100DCKR, Pricing 1="1=0.43000, 10=0.32000, 50=0.32000, 100=0.21600, 500=0.17900, 1000=0.13400, 3000=0.11600, 10000=0.11600 (USD)", RoHS=Yes, Supplier 1=Mouser
U3: "Linear Voltage Regulator IC Positive Fixed 1 Output 3.3V 1A SOT-25", Case/Package=SOT-25, Dropout Voltage=655mV, Manufacturer=Torex, Max Input Voltage=6V, Max Operating Temperature=85°C, Min Current Limit=1.005A, Min Input Voltage=1.6V, Min Operating Temperature=-40°C, Nominal Output Voltage=3.3V, Output Current=1A, Package Quantity=1, Supplier Part Number 1=84R0738, Category="Voltage Regulators - Linear", ComponentLink1Description=https://datasheet.ciiva.com/7992/610888-7992813.pdf?src-supplier=Element14, ComponentLink1URL=https://datasheet.ciiva.com/7992/610888-7992813.pdf?src-supplier=Element14, ComponentLink2Description=https://datasheet.ciiva.com/5755/610888-5755886.pdf?src-supplier=Farnell, ComponentLink2URL=https://datasheet.ciiva.com/5755/610888-5755886.pdf?src-supplier=Farnell, ComponentLink3Description=https://datasheet.ciiva.com/2040/xc6220-2040201.pdf?src-supplier=Digi-Key, ComponentLink3URL=https://datasheet.ciiva.com/2040/xc6220-2040201.pdf?src-supplier=Digi-Key, ComponentLink4Description=https://datasheet.ciiva.com/2040/xc6220-2040200.pdf?src-supplier=Digi-Key, ComponentLink4URL=https://datasheet.ciiva.com/2040/xc6220-2040200.pdf?src-supplier=Digi-Key, ComponentLink5Description=https://datasheet.ciiva.com/2040/xc6220-2040202.pdf?src-supplier=Digi-Key, ComponentLink5URL=https://datasheet.ciiva.com/2040/xc6220-2040202.pdf?src-supplier=Digi-Key, Manufacturer Part Number=XC6220B331MR-G, Mount="Surface Mount", Number of Pins=5, Number of Regulators=1, Output Type=Fixed, Output Voltage=3.3V, Packaging="Tape and Reel", Pricing 1="1=1.20000, 10=1.08000, 100=0.83900, 500=0.69300, 1000=0.54800 (USD)", REACH SVHC="No SVHC", RoHS=Yes, RoHS Compliant=Yes, Series=-, Stock 1=3078, Supplier 1=Newark
U4: "IC ADC 24BIT SIGMA-DELTA 32TQFP", Manufacturer="Texas Instruments", Supplier Part Number 1=595-ADS131M08IPBSR, Category="Analog to Digital Converters (ADCs)", Manufacturer Part Number=ADS131M08IPBSR, Pricing 1="1=8.85000, 10=7.99000, 50=7.62000, 100=6.62000, 1000=5.39000, 10000=5.39000 (USD)", RoHS=Yes, Supplier 1=Mouser
U5 U6: "IC ADC/AUDIO 24BIT 192K 30TSSOP", Case/Package=TSSOP, Manufacturer="Texas Instruments", Max Operating Temperature=125°C, Max Supply Voltage=3.6V, Min Operating Temperature=-40°C, Min Supply Voltage=3V, Operating Supply Current=31mA, Operating Supply Voltage=3.3V, Package Quantity=2000, Power Consumption=145mW, Supplier Part Number 1=595-PCM1865DBTR, Category="Amplifiers - Audio", ComponentLink1Description=https://datasheet.ciiva.com/48474/pcm1861-48474798.pdf?src-supplier=Avnet, ComponentLink1URL=https://datasheet.ciiva.com/48474/pcm1861-48474798.pdf?src-supplier=Avnet, ComponentLink2Description=https://datasheet.ciiva.com/29699/pcm1861-29699238.pdf?src-supplier=Digi-Key, ComponentLink2URL=https://datasheet.ciiva.com/29699/pcm1861-29699238.pdf?src-supplier=Digi-Key, Contact Plating=Gold, Interface=I2C,SPI,Serial, Lead Free="Lead Free", Manufacturer Part Number=PCM1865DBTR, Mount="Surface Mount", Number of A/D Converters=4, Number of ADC Channels=4, Number of Analog Inputs=8, Number of DAC Channels=0, Number of Pins=30, Packaging="Tape and Reel", Pricing 1="1=10.72000, 10=9.69000, 25=9.23000, 50=9.23000, 100=8.02000, 250=7.66000, 500=6.98000, 1000=6.54000, 10000=6.54000 (USD)", Resolution=24b, RoHS=Yes, RoHS Compliant=Yes, Sampling Rate=192KS/s, Supplier 1=Mouser, Supply Type=Single, Weight=0.003439oz
U7: "IC RF TXRX+MCU BLUETOOTH WIFI", Manufacturer="Espressif Systems", Supplier Part Number 1=1904-ESP32-D0WD-V3CT-ND, Category="RF Receivers, Transceivers", Manufacturer Part Number=ESP32-D0WD-V3, Pricing 1="1=1.80000 (USD)", RoHS=No, Stock 1=29666, Supplier 1=Digi-Key
U8: "IC FLASH 8MBIT SPI 86MHZ 8SOP", Case/Package=SOIC, Frequency=86MHz, Manufacturer=Macronix, Max Operating Temperature=85°C, Min Operating Temperature=-40°C, Operating Supply Voltage=3.6V, Package Quantity=98, Supplier Part Number 1=1123114, Temperature Grade=INDUSTRIAL, Category=Flash, ComponentLink1Description=http://ckassoc.com/oldsite/pdf/Macronix_Product_Line_Card_July_2017_General%20_070617.pdf?src-supplier=Digi-Key, ComponentLink1URL=http://ckassoc.com/oldsite/pdf/Macronix_Product_Line_Card_July_2017_General%20_070617.pdf?src-supplier=Digi-Key, ComponentLink2Description=http://www.macronix.com/Lists/DataSheet/Attachments/1610/MX25L8006E,%203V,%208Mb,%20v1.4.pdf?src-supplier=Future+Electronics, ComponentLink2URL=http://www.macronix.com/Lists/DataSheet/Attachments/1610/MX25L8006E,%203V,%208Mb,%20v1.4.pdf?src-supplier=Future+Electronics, Density=8Mb, Interface=SPI,Serial, Lead Free="Lead Free", Manufacturer Part Number=MX25L8006EM2I-12G, Max Frequency=86MHz, Memory Size=8Mb, Memory Type=Non-Volatile,FLASH, Mount="Surface Mount", Packaging=Rail/Tube, Pricing 1="1=0.54000, 75=0.47500, 250=0.46000, 750=0.44500, 2500=0.43000 (USD)", RoHS=Yes, RoHS Compliant=Yes, Series=MX25xxx05/06, Stock 1=5568, Supplier 1="Future Electronics", Supply Voltage-Nom=3.6V
U9: "RF ANT 2.4GHZ STAMPED MET SLD", Manufacturer=Proant, Supplier Part Number 1=1532-1001-6-ND, ComponentLink1Description=https://media.digikey.com/pdf/Data%20Sheets/Proant%20PDF's/PRO-OB-440_Dwg.PDF?src-supplier=Digi-Key, ComponentLink1URL=https://media.digikey.com/pdf/Data%20Sheets/Proant%20PDF's/PRO-OB-440_Dwg.PDF?src-supplier=Digi-Key, ComponentLink2Description=http://www.proant.se/files/user/Application%20note%20-%20OnBoard%20SMD%20GNSS%20rev%202.0.pdf?src-supplier=Digi-Key, ComponentLink2URL=http://www.proant.se/files/user/Application%20note%20-%20OnBoard%20SMD%20GNSS%20rev%202.0.pdf?src-supplier=Digi-Key, ComponentLink3Description=http://www.proant.se/files/user/Documents/Datasheet%20-%20OnBoard%20SMD%202400%20MHz%20rev%203.pdf?src-supplier=Digi-Key, ComponentLink3URL=http://www.proant.se/files/user/Documents/Datasheet%20-%20OnBoard%20SMD%202400%20MHz%20rev%203.pdf?src-supplier=Digi-Key, Manufacturer Part Number=PRO-OB-440, Mount="Surface Mount", Number of Bands=1, Packaging="Cut Tape", Pricing 1="1=0.74, 10=0.647, 25=0.608, 100=0.4964, 250=0.46104, 500=0.39238 (USD)", Return Loss=-10dB, Stock 1=23502, Supplier 1=Digi-Key, Termination=Solder
U10: library part 4677, "IC PSRAM 64MBIT SPI 133MHZ 8SOIC", Manufacturer="Adafruit Industries", Supplier Part Number 1=83AH9315, Category=Memory, Manufacturer Part Number=4677, Pricing 1="1=1.75000 (USD)", RoHS=No, Supplier 1=Newark
U13: "2 NPN pre-biased (Dual) 150mW 100mA 50V SC-70-6(SOT-363) Digital Transistors ROHS", Manufacturer=Changjiang, Package=SC-70-6(SOT-363), ComponentLink1Description=LCSC, ComponentLink1URL=https://www.lcsc.com/product-detail/Digital-Transistors_Changjiang-Electronics-Tech-CJ-UMH3N_C62892.html, Manufacturer Part No=UMH3N
X1: "8.192MHz SMD Crystal Resonator 12pF 150Ω ±10ppm ±30ppm -40℃~+85℃ SMD_3225_4P Crystals ROHS", Manufacturer=JYJE, Package=Custom, Manufacturer Part No=3TJ481920NYLBC
X2 X3: "24.576MHz SMD Crystal Resonator 12pF 60Ω ±10ppm -40℃~+85℃ SMD3225-4P Crystals ROHS", Manufacturer=JGHC, ComponentLink1Description=LCSC, ComponentLink1URL=https://lcsc.com/product-detail/Crystals_JGHC-S3224576121060_C390772.html, Manufacturer Part Number=S3224576121060
X4: "40MHz SMD Crystal Resonator 15pF ±10ppm ±30ppm -40℃~+85℃ SMD3225-4P Crystals ROHS", Manufacturer="Yangxing Tech", Manufacturer Part No=X322540MPB4SI

## Free pads (board coordinates)
  round 196.85 hole 118.11: MH1(2.69,2247.06) MH2(0,0) MH3(2408,3.15) MH4(2410.69,2243.91)

## Via types
v1: diameter 23.62, hole 11.81, Top Layer to Bottom Layer, tented both sides, 246 vias

## Nets (pads, with @x,y where several pads share a name; then routed paths per layer and width w, separated by ;. In a path a pad name is that pad's centre, name@x,y a point inside that pad or via, vN(x,y) a via of type N, cw(c..) or ccw(c..) an arc to the next point about the centre after c; other vN are vias at no path point)
3V3: C2.1 C3.1 C4.1 C5.1 C6.1 C7.1 C8.1 C9.1 C10.1 C11.1 C12.1 C13.1 C14.1 C15.1 C16.1 C17.1 C18.1 C27.1 C29.1 C31.1 C33.1 C56.1 C57.1 C58.1 C59.1 C75.1 C76.1 C77.1 C78.1 C79.1 C80.1 C81.1 C82.1 D1.1 L1.1 MK1.1 MK2.1 MK3.1 MK4.1 MK5.1 MK6.1 MK7.1 MK8.1 R1.1 R2.1 R3.1 R17.2 SB8.1 SB9.1 SB26.1 SB27.1 SB28.1 SB70.1 SB71.1 SB72.1 U3.5 U5.25 U7.1 U7.19 U7.37 U7.43 U7.46 | length 9865.5
  Top Layer w5: v1(1051.71,2419.89) 1067.11,2419.89 1073.11,2413.89 U7.19@1094.74,2413.89 ; U7.37@1266.79,2310.74 1266.79,2287.32 1296.11,2258 1360.69,2258 v1(1362,2256.69) ; U7.1@1280.57,2503.26 1280.78,2503.48 v1(1295.69,2503.48) ; U7.43@1287.26,2400.11 1320.07,2400.11 1324.04,2404.08 1336.32,2404.08 v1@1340.88,2408.64 ; U7.46@1287.26,2441.45 1310.5,2441.45 1341,2471.95 1341,2516 1357.94,2532.94 1372.75,2532.94 v1(1374,2534.19) ; v1@1297,1692 v1(1294.5,1694.5) v1@1297,1694.5
  Top Layer w10: v1(645.69,625.06) 667.32,603.43 U5.25@715.69,603.43 ; v1@905.69,175.06 909.69,179.06 v1@911.19,179.06 ; v1@1295,2504.17 v1(1295.69,2503.48) 1295.69,2627.33 1306,2637.64 v1(1306,2640)
  Top Layer w30: v1(-111.97,1563.07) MK8.1@-111.97,1633.58 ; v1@1706.38,2401.94 MK2.1@1706.38,2442.19
  Top Layer w40: MK7.1@-80.05,545.57 -80.05,462.32 v1(-106.73,435.64) -106.73,371.73 -55,320 v1(439,320) 546.69,212.31 v1(546.69,-22.94) ; v1(3.69,1563.06) 320.06,1563.06 v1(541,1784) 541,2288.37 v1(621.69,2369.06) ; v1@621.2,2369.55 MK1.1@621.2,2409.8 ; v1(694.69,-143.86) v1@694.69,126.07 ; MK6.1@695.18,-184.6 v1@695.18,-144.35 ; v1(1778.69,-113.94) 1778.69,-57.31 2117.69,281.69 v1(2117.69,368.06) ; MK5.1@1779.18,-154.68 v1@1779.18,-114.43 ; v1@2036.76,1932.06 2217.68,1932.06 2440.18,1709.55 MK3.1@2480.43,1709.55 ; v1@2472.41,624.49 MK4.1@2512.66,624.49
  Bottom Layer w5: 1303.17,2400.11 1333.35,2400.11 v1(1340.88,2407.64)
  Bottom Layer w20: L1.1@1202,2600 1203.38,2600 1242.38,2639 v1@1306,2639
  Bottom Layer w22: C81.1@1014,2608 1014,2554 1051.71,2516.29 v1(1051.71,2419.89)
  Bottom Layer w25: C3.1@602.69,2414.06 681.06,2414.06 736.88,2469.88 736.88,2603
  Bottom Layer w40: v1(-111.97,1563.07) v1(3.69,1563.06) ; 462.35,2618.53 472.88,2608 752.31,2608 C76.1@756.31,2604 ; 474,2646 474,2680 513,2719 D1.1@736.72,2719 ; v1(541,1784) 667,1658 v1(667,1585) ; v1(546.69,-22.94) 695.69,-22.94 ; v1(693.69,127.06) 862.19,127.06 v1(911.19,176.06) ; v1@1467.5,1694.5 v1(1294.5,1694.5) 1220.11,1694.5 1201.49,1713.12 1127.1,1713.12 1053.5,1639.53 v1(1053.5,1587.06) 1053.5,1468.5 1094.75,1427.25 1528.36,1427.25 1751,1649.89 v1@2033.69,1932.58 ; 2270,524 2270,1027 2488.69,1245.69 2488.69,1705.06 ; 2353.19,456.56 2374.69,456.56
  other v1: 1613.69,-15.94 2471.92,623.99 1469,1693 2439.69,1709.06 2035.76,1932.06 1706.87,2401.45
5V: C#2.1 D2.2 J2.A9 J2.B9 U1.1 U2.3 | length 2862.9
  Top Layer w22: -213,1195.79 -213,1090.32 -213,856 -308,761 -308,438 -97,227 42,227 303,-34 303,-293 344.19,-334.19 v1(1084.85,-334.19)
  Bottom Layer w22: v1(1084.69,-132.94) 1084.77,-133.01 1084.77,-334.11 v1(1084.85,-334.19)
\C\S: R3.2 SB5.2 U4.17 U7.16 | length 1714.2
  Top Layer w5: v1(959,2467) 984.21,2467 995.51,2455.7 996.97,2454.24 999.08,2454.24 1094.51,2455 U7.16@1094.74,2455.23
  Top Layer w10: v1@835.5,1936.62 v1(1060.97,1936.62) ; U4.17@1220.59,1597.61 1220.59,1639.59 1230,1649 1310,1649 1319,1658 1319,1754 ; 1324.86,1743.56 1335.69,1743.56 1337.35,1745.22 R3.2@1337.35,1756.56
  Top Layer w22: v1(1339,1791) 1339.31,1790.69 1339.31,1764.94 1345.69,1758.56 R3.2@1345.69,1756.06
  Top Layer w25: v1(864.5,2243.93) v1(955.81,2243.98) v1(955.81,2243.98)
  Bottom Layer w8: SB5.2@955.88,2445.88 SB5.2@960,2450
  Bottom Layer w20: v1(832.6,1936.62) 832.6,2071.6 863.81,2102.81 863.81,2243.24 v1(864.5,2243.93) ; v1@955.81,2244.96 955.81,2445.81 SB5.2@960,2450 ; SB5.2@955.88,2445.88 SB5.2@958.38,2443.38 ; v1(1060.97,1936.62) 1321.49,1936.62 1339,1919.11 v1(1339,1791)
\D\R\D\Y\: R2.2 U4.18 | length 82.7
  Top Layer w8: U4.18@1200.9,1597.61 R2.2@1200.9,1680.27
\R\E\S\E\T\: R1.2 U4.16 | length 210.6
  Top Layer w10: U4.16@1273.74,1544.46 1274.64,1545.37 1308.45,1545.37 1319,1555.92 1319,1614.6 1346.69,1642.29 R1.2@1346.69,1705.06
ADC1_XIN: R7.2 U4.22 | length 352.3
  Top Layer w10: U4.22@1122.16,1597.61 1122.16,1665.54 1174.94,1718.31 1275.31,1718.31 1298,1741 v1(1298,1795.19)
  Bottom Layer w20: 1298,1835.19 1298,1841 1298.5,1841.5 R7.2@1298.5,1858.03
ADC1_XOUT: C87.2 L3.2 SB31.2 | length 224
  Bottom Layer w22: L3.2@1198.09,1497 1198.09,1498.38 1204.81,1505.09 1206.19,1505.09 1246.46,1545.37 1298.61,1545.37 1311.5,1532.48 C87.2@1311.5,1495
  Bottom Layer w25: SB31.2@1147,1497 1184,1497 L3.2@1191,1504
ADC1_XOUT#: C44.2 SB31.1 SB33.1 U4.23 X1.3 | length 268.8
  Top Layer w10: v1(1102.48,1553.31) U4.23@1102.48,1597.61 1102.48,1669.62 1107.69,1674.83 1107.69,1675.11 1108.69,1676.11 C44.2@1108.69,1769.49
  Bottom Layer w25: SB33.1@1097,1557 1122,1557 SB31.1@1147,1557
BCKA: U5.17 U7.24 | length 2144.2
  Top Layer w5: 1057.07,2336.92 1065.14,2344.99 U7.24@1094.74,2344.99
  Top Layer w10: U5.17@715.69,445.95 834.95,445.95 955.5,566.5 v1(955.5,588.41) ; v1(955.81,2211.31) 965.96,2219.48 980.31,2233.83 1049,2303.65 1049,2328.85 1057.07,2336.92
  Bottom Layer w12: v1(955.5,588.41) 954.75,589.16 954.75,2210.25 v1(955.81,2211.31)
BCKB: U6.17 U7.39 | length 2882.7
  Top Layer w5: U7.39@1287.26,2344.99 1309.01,2344.99 1318,2336 1318,2306.41 v1(1316.39,2304.8)
  Top Layer w10: U6.17@1947.87,445.95 2120.26,445.95 2182.52,508.22 v1@2182.52,607.14
  Bottom Layer w20: v1(1316.39,2304.8) 1316.39,2243.57 1345,2214.96 1345,2174 1387,2132 1928,2132
  Bottom Layer w22: 1928,2132 2072,2132 2182.52,2021.48 v1(2182.52,607.81)
CAP1: C83.2 C84.1 R5.1 U7.48 | length 184.1
  Top Layer w5: U7.48@1287.26,2469.01 U7.48@1288.7,2470.44 ; U7.48@1288.7,2469.44 1304.55,2469.44 1309.11,2474 1317,2481.89 1317,2601 1324,2608 1331.5,2608 1334.77,2611.27 1334.77,2618.77
CAP2: C83.1 R5.2 U7.47 | length 155.3
  Top Layer w5: U7.47@1287.26,2455.23 1287.48,2455.45 1307.53,2455.45 1329,2476.92 1329,2525 1347,2543 C83.1@1347,2574
"DEBUG SIG.ENABLE": P1.5 R17.1 SW1.1 U7.9 U13.6 | length 8488.7
  Top Layer w5: 1145.85,2586.69 1154.31,2586.69 1181,2560 1181,2536.05 1170.33,2525.38 U7.9@1170.33,2503.26
  Top Layer w8: 741,2568 760.02,2586.97 1013.98,2586.69 1145.85,2586.69
  Top Layer w10: 427,2585 724,2585 741,2568 741,2342 775.45,2307.55 U13.6@919.51,2307.55
  Top Layer w20: v1(-308,1818) -308,1585 -533,1360 -533,939 -338,744 -338,428.4 -105.6,196 33.4,196 258,-28.6 258,-296 327,-365 818,-365 1059,-606 1362,-606 1480,-488 1840,-488 2052,-276 v1(2052,-210) ; 341,2572.37 v1(352.69,2584.06)
  Top Layer w25: v1(341,2323) 341,2572.37
  Bottom Layer w20: v1(-308,1818) -164,1818 v1(341,2323) ; v1(2052,-210) 2052,-119 2303,132 2507,132 2751,376 2751,651 P1.5@2817,717
"DEBUG SIG.IO_0": P1.3 U7.23 U13.3 | length 7510.4
  Top Layer w8: v1(891,2392) 938,2392 971.27,2358.73 U13.3@995.89,2358.73 ; U13.3@995.89,2358.73 U7.23@1094.74,2358.77
  Top Layer w10: v1(1938,-333) 1938,-280.4 2764.4,546 2817,546 2881,610 2881,853 P1.3@2817,917
  Top Layer w12: v1(161,1837) -171,1837 -266,1742 -266,1597 -120,1451 -120,877 -264,733 -264,458 -83,277 53,277 424,-94 v1(424,-295)
  Bottom Layer w8: v1(161,1837) 542,2218 631.63,2218 631.69,2218.06 641.06,2218.06 683,2260 683,2296 795,2408 873.33,2408 889.33,2392 v1(891,2392)
  Bottom Layer w10: v1(424,-295) 562,-433 1838,-433 v1(1938,-333)
"DEBUG SIG.IO_2": P1.4 U7.22 | length 7417.5
  Top Layer w5: v1(895,2427) 922.03,2427 932.03,2417 987,2417 1031.45,2372.55 U7.22@1094.74,2372.55
  Top Layer w10: v1(156.5,1875.5) -162.5,1875.5 -284,1754 -284,1587 -141,1444 -141,886 -284,743 -284,450 -89,255 46.53,255 355,-53.47 v1(355,-295)
  Top Layer w12: v1(1424,-457) 1802,-457 1912,-347 1912,-280.94 2720,527.06 2720,720 P1.4@2817,817
  Bottom Layer w10: v1(156.5,1875.5) 515,2234 628,2234 664,2270 664,2299.63 791.37,2427 v1(895,2427) ; v1(355,-295) 516,-456 1423,-456 v1(1424,-457)
DOUT1: U5.18 U7.14 | length 2423.6
  Top Layer w5: v1(909,2523) 928.74,2503.26 U7.14@1101.43,2503.26
  Top Layer w10: U5.18@715.69,465.64 827.64,465.64 926,564 v1@926,620
  Bottom Layer w20: v1(909,2523) 909,2470 926,2453 v1(926,614.06)
DOUT2: U6.18 U7.15 | length 5135.6
  Top Layer w5: v1(823,2490) 1012,2490 1032.99,2469.01 U7.15@1094.74,2469.01
  Top Layer w10: U6.18@1947.87,465.64 2103.27,465.64 2124,486.37 v1(2124,487)
  Top Layer w22: v1(799.85,241.35) 1947.35,241.35 2036.69,330.69 v1(2036.69,399.06)
  Bottom Layer w10: 586,2296 629,2296 v1(823,2490)
  Bottom Layer w20: 77,552.8 77,1924 449,2296 586,2296
  Bottom Layer w22: 77,552.8 388.48,241.33 v1@799.82,241.33 ; v1(2036.69,399.06) 2036.69,399.38 2124,486.69 v1(2124,487)
DTR: J1.4 U13.2 U13.4 | length 3189
  Top Layer w8: v1(701,1955) 682,1936 682,1859 711,1830 1094.44,1830 1127.44,1863 1211.38,1863 1221.38,1873 1744,1873
  Top Layer w10: v1(888.68,2357.55) 889.27,2358.14 918.92,2358.14 U13.4@919.36,2358.58 ; U13.4@919.51,2358.73 U13.4@919.36,2358.58 ; U13.2@995.89,2333.14 995.49,2333.54 971.46,2333.54 946.42,2358.58 U13.4@919.36,2358.58
  Top Layer w22: 1744,1873 1785,1873 2328,1330 2808,1330 J1.4@2818,1340
  Bottom Layer w10: v1(701,1955) 701,2290 794,2383 863.42,2383 888.68,2357.75 v1(888.68,2357.55)
FEED: SB51.1 SB52.1 U7.2 | length 60.5
  Top Layer w5: U7.2@1266.79,2503.26 SB51.1@1266.79,2563.79
FEED#: C91.1 L6.2 SB52.2 | length 115.6
  Top Layer w22: SB52.2@1207,2627 v1(1207,2658)
  Bottom Layer w22: v1@1207.02,2658.02 C91.1@1207.02,2742.57
GND: C1.2 C2.2 C3.2 C4.2 C5.2 C6.2 C7.2 C8.2 C9.2 C10.2 C11.2 C12.2 C13.2 C14.2 C15.2 C16.2 C17.2 C18.2 C19.1 C20.1 C22.2 C27.2 C29.2 C31.2 C33.2 C36.2 C43.1 C44.1 C53.1 C54.1 C55.2 C56.2 C57.2 C58.2 C59.2 C61.1 C62.1 C70.1 C71.1 C72.2 C73.1 C74.1 C75.2 C76.2 C77.2 C78.2 C79.2 C80.2 C81.2 C82.2 C84.2 C85.2 C86.2 C87.1 C88.1 C89.1 C90.2 C91.2 C#1.2 C#2.2 D1.2 D2.1 D3.1 J1.5 J2.A12 J2.B12 J2.MH1 J2.MH2 J2.MH3 J2.MH4 J3.2 J4.2 J4.3 MK1.4 MK2.4 MK3.4 MK4.4 MK5.4 MK6.4 MK7.4 MK8.4 P1.6 pad.MH1 pad.MH2 pad.MH3 pad.MH4 R11.2 R12.2 SW1.2 U1.2 U2.2 U3.2 U4.13 U4.25 U4.28 U5.7 U5.12 U6.7 U6.12 U6.25 U7.49 U8.4 U9.1 U10.4 X1.2 X1.4 X2.2 X2.4 X3.2 X3.4 X4.2 X4.4 | length 13436.5
  Top Layer w10: 372.69,482.06 393.69,503.06 417.69,503.06 435.43,485.32 U5.12@487.35,485.32 524.26,485.32 557.52,452.06 v1(586.52,452.06) 586.52,563.06 ; U5.7@487.35,583.75 565.83,583.75 586.52,563.06 ; v1@539.52,664.06 580.66,664.06 586.52,658.2 586.52,563.06 ; 695,1637 644,1637 608,1601 608,1531 653.6,1485.4 U4.28@1029.64,1485.4 1029.8,1485.25 1068.69,1485.25 ; U4.25@1029.64,1544.46 1072.29,1544.46 1080.69,1536.06 1080.69,1497.25 1068.69,1485.25 ; C22.2@1439.69,1540.06 1439.69,1495.06 1430.03,1485.4 U4.13@1273.74,1485.4 1273.59,1485.25 1068.69,1485.25 ; U6.12@1719.52,485.32 1756.43,485.32 1789.69,452.06 v1(1818.69,452.06) 1818.69,563.06 ; U6.7@1719.52,583.75 1798.01,583.75 1818.69,563.06 ; v1(1771.69,664.06) 1812.83,664.06 1818.69,658.2 1818.69,563.06 ; v1(1867.36,582.4) 1868.03,582.4 1889.06,603.43 U6.25@1947.87,603.43 2020.83,603.43 2026.69,597.57 v1(2026.69,571.24)
  Top Layer w20: U10.4@1269,1998.7 U10.4@1269.26,1998.43
  Top Layer w22: 689,1803 664.06,1803 654,1813.06 654,1961 690,1997 U8.4@942.73,1997 ; 709,1807.06 797,1719.06 840.35,1719.06 ; C73.1@1360.69,518.06 1356.69,514.06 1324.69,514.06 1306.69,496.06 1306.69,443.06 1338.69,411.06 1504.08,411.06 1504.69,411.68
  Top Layer w25: -421.81,1276.59 -403.56,1258.35 -204.35,1258.35 -182.31,1236.31 D2.1@-182.31,1205.06 ; C84.2@1439,2569.5 1475.5,2569.5 ; C86.2@1565,2332 C86.2@1567.5,2334.5 ; C86.2@1565.5,2334.5 C20.1@1565.5,2380.5 ; 1567.5,2380.5 1569,2382 1570,2382
  Top Layer w40: X2.4@299.31,456.06 X2.4@299.31,456.23 ; SW1.2@393.56,2663.53 447.13,2692.51 469,2686 ; v1(460.69,-243.94) MK6.4@608.69,-243.94 ; v1(1254.69,-311.94) 1254.69,-540.94 J3.2@1256.69,-542.94 ; MK5.4@1771.69,-257.94 1866,-163.63 1866,-67.32 v1(2173,239.68) v1(2173,429) ; v1(2035.95,1872.79) 2191.96,1872.79 v1(2363.69,1701.06) ; v1(2560,1230) J1.5@2817,1230
  Top Layer w50: v1(999,2837) U9.1@1049.37,2837 ; U7.49@1191,2407 U7.49@1227.62,2443.62 ; 1691.5,2565 1701,2565 1744.43,2521.57 1773.03,2521.57 MK2.4@1784.69,2509.91
  Bottom Layer w20: v1(1316,2002.24) 1372,1946.24 1372,1846 1391,1827 1424,1827
  Bottom Layer w22: v1(170.56,530.03) 193.65,506.94 257.44,506.94 v1(290.17,474.2) ; C55.2@496.38,664.75 540.38,664.75 v1(540.69,665.06) ; C87.1@1371.5,1493 1535,1493 v1(1582,1540) ; C72.2@1726.69,663.06 1727.38,663.75 1771.38,663.75 v1(1771.69,664.06) ; v1@1747.75,1550.69 1945.69,1550.69 2035.95,1640.95 v1(2035.95,1872.79)
  Bottom Layer w25: v1(598,2664) C76.2@756.31,2664 ; 896,2676 v1(896,2721) ; v1(1180,1817) 1231,1766 v1(1231,1765) 1256.81,1739.19 1311.81,1739.19 1312,1739 1530,1739 1549,1758 1549,1789 1559,1799 ; v1(1242.32,2443.62) 1262.5,2463.8 1262.5,2559.08 1280.92,2577.5 v1(1659.5,2577.5) ; P1.6@2817,617 2897,697 2897,760
  Bottom Layer w40: -108,336.7 -108,108 pad.MH2@0,0 243.94,-243.94 v1@457.69,-243.94 ; C77.2@811.26,2664 827.28,2680.01 D1.2@827.28,2719 ; v1@1003,2841 C90.2@1096,2841 1096,2768.51 1121.93,2742.57 C91.2@1147.02,2742.57 1147.02,2670.02 C75.2@1141,2664 ; v1@1252.69,-311.94 1252.69,-110.94 ; 1254.69,-110.94 1257.69,-110.94 ; v1(2026.69,571.24) 2130.76,571.24 2173,529 v1(2173,429) ; v1(2173,239.68) 2195.32,262 2444,262 2579,397 MK4.4@2579,545 ; 2340.69,649.06 2340.69,670.56 2344.19,674.06 2344.19,1016.19 2583.69,1255.69 MK3.4@2583.69,1702.06
  Bottom Layer w50: MK5.4@1771.69,-257.94 2146.91,-257.94 pad.MH3@2408,3.15 ; J1.5@2817,1230 2897,1150 2897,760
  other v1: 1294.69,-63.94 -31.31,372.06 1830.69,399.06 1747,1551 1587,1792 1206,2356 259,2579
INTA: SB4.1 U5.21 | length 2695.5
  Top Layer w10: U5.21@715.69,524.69 802.69,524.69 833.69,555.69 833.69,613.55 v1(833.2,614.04) ; v1(832.6,1904.81) 1062.83,1904.81 1098.02,1940 1604,1940 1668.62,2004.62 1668.62,2214.11 v1(1648.14,2234.58)
  Bottom Layer w20: v1(832.6,1904.81) 833.2,1904.21 v1(833.2,614.04)
  Bottom Layer w22: SB4.1@1549,2234.33 1549.12,2234.46 1648.02,2234.46 v1(1648.14,2234.58)